# Allegro board circuitorx.brd
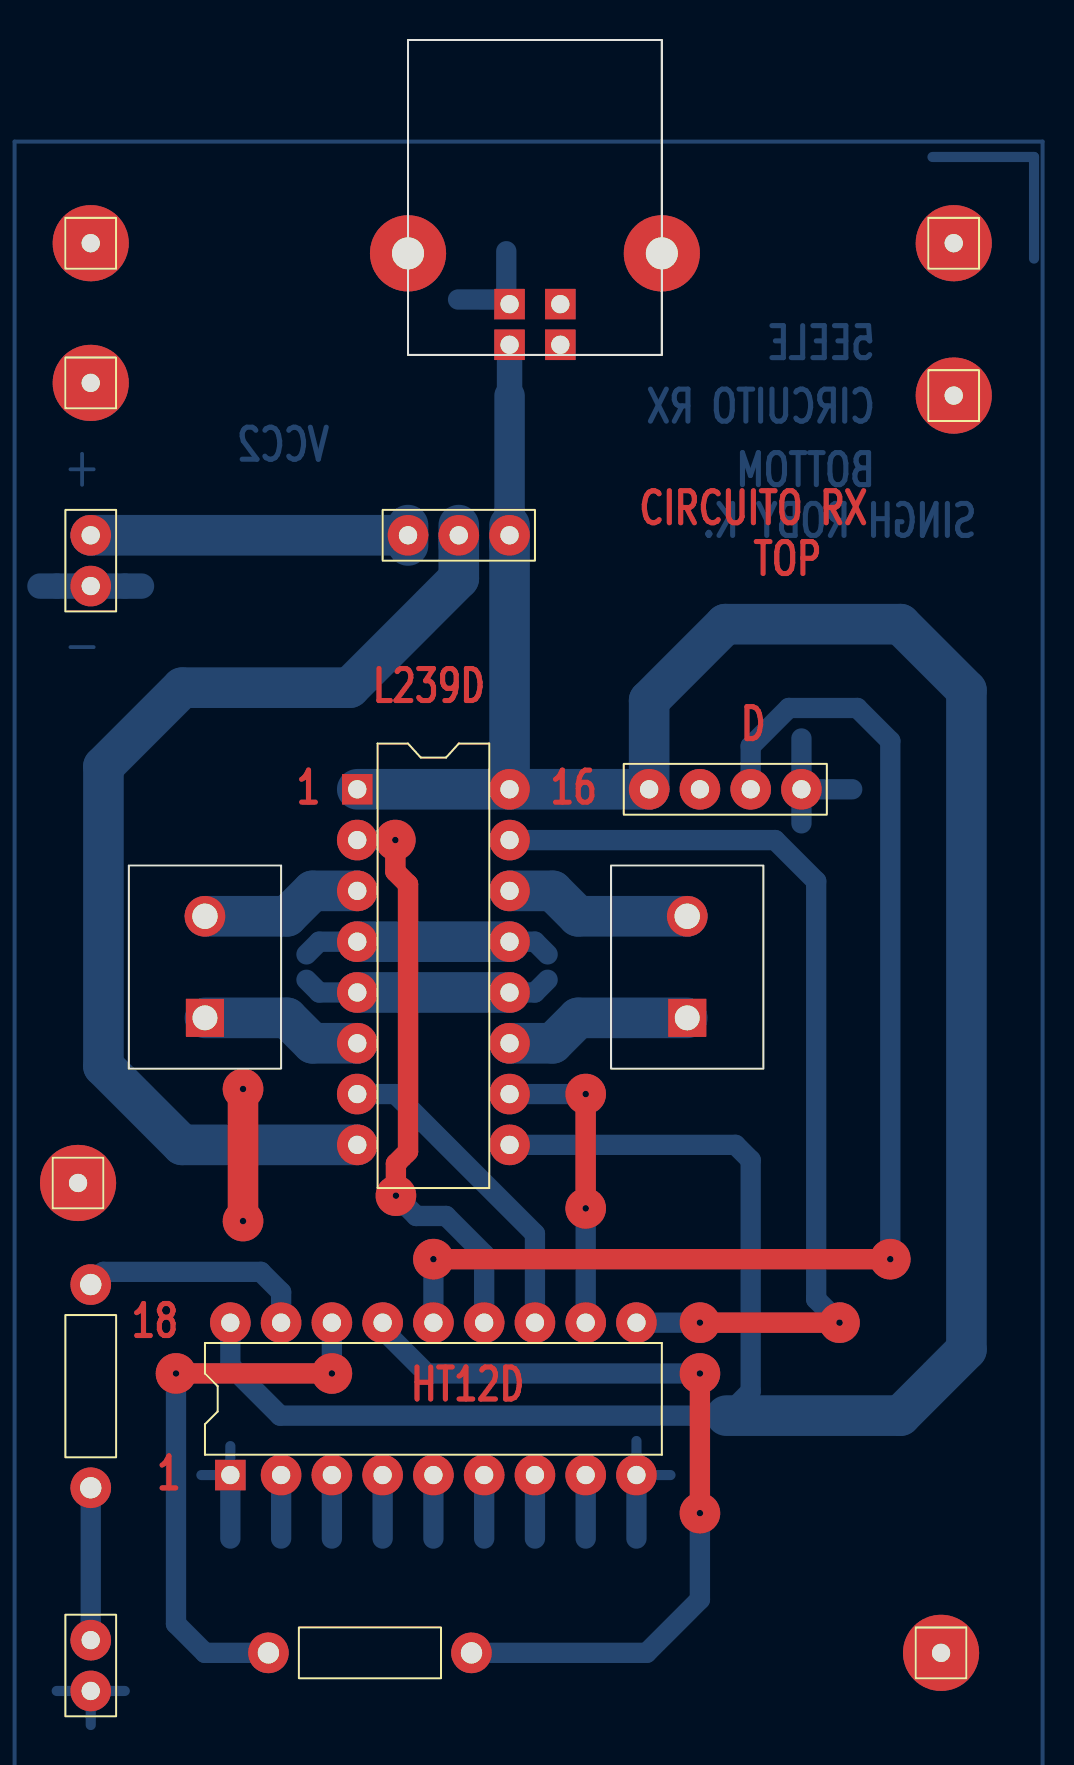
[diagram p0: board, top side]
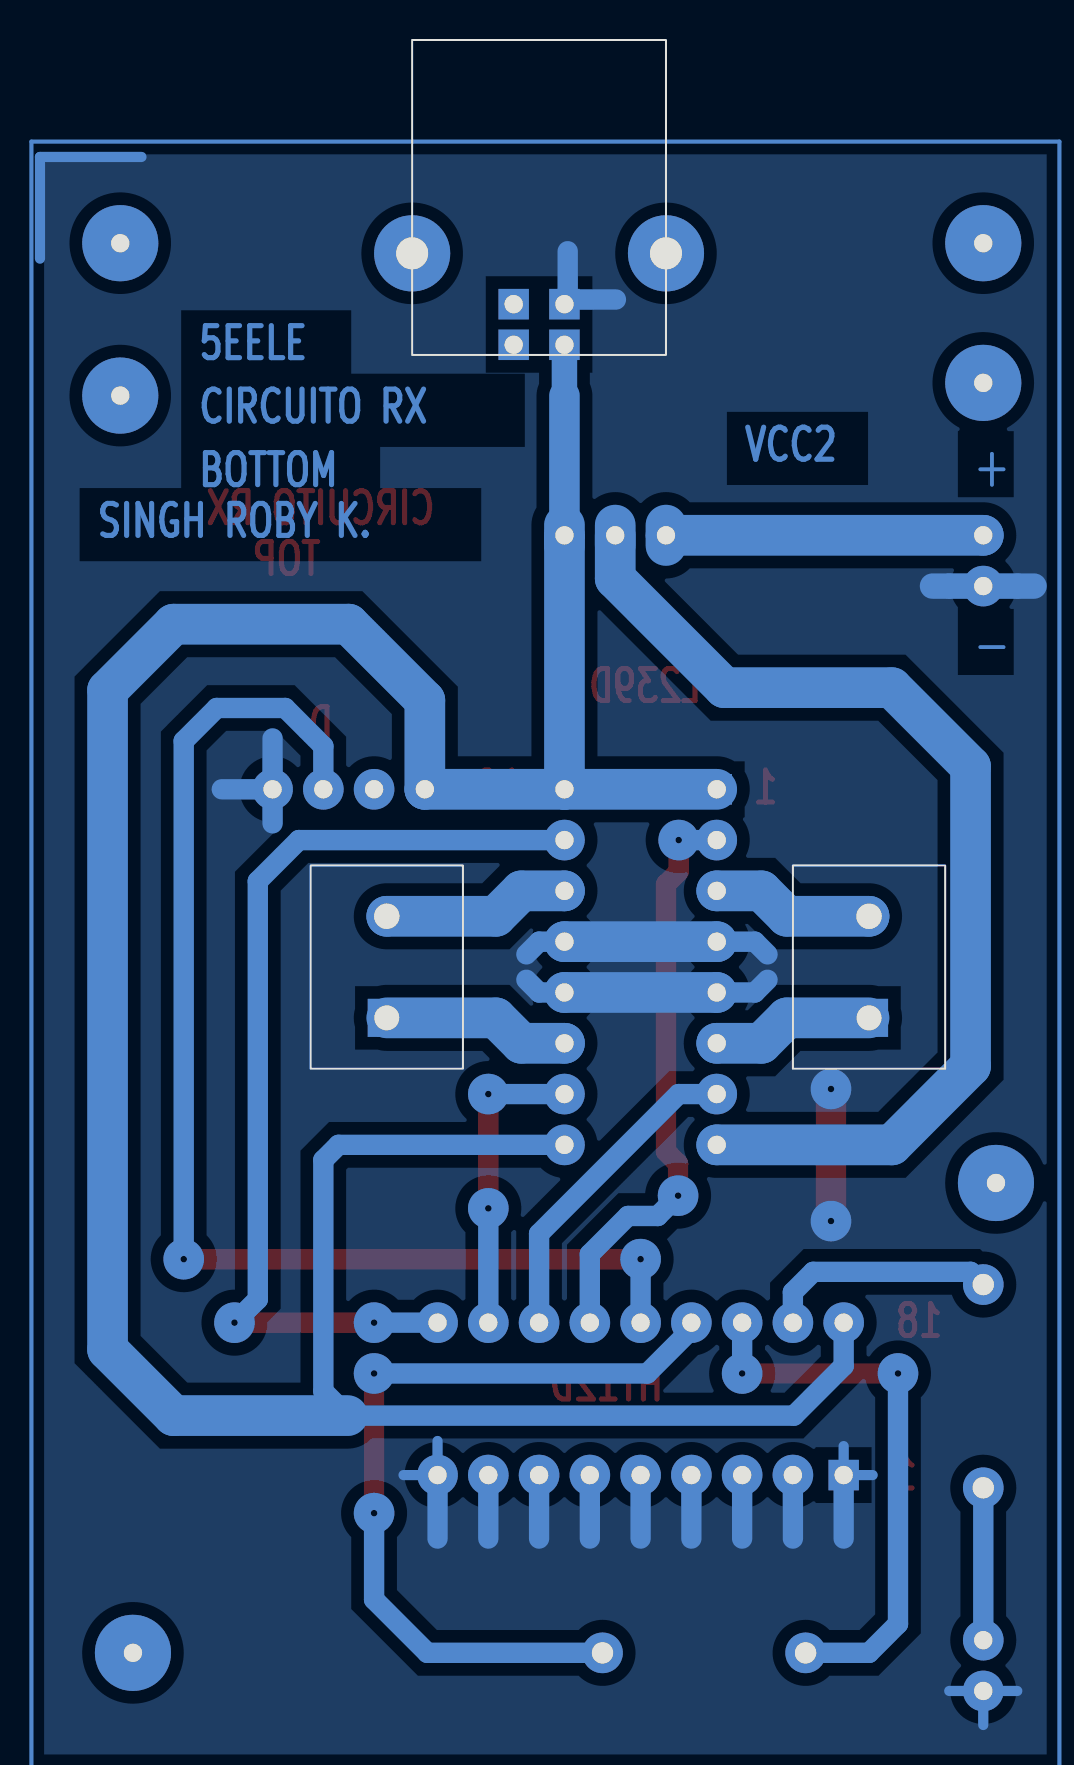
[diagram p1: board, bottom side, seen from below]

Outline 31.75 x 51.44 mm; copper layers: TOP, BOTTOM. Coordinates in mm from the lower left corner of the outline.

## Placement (name value [footprint] x y rotation side)
D1  LED  [JUMPER2]  -1.91 -31.11 90 top
J2  CON1  [JUMPER1]  41.27 41.28 0 top
J3  CON1  [JUMPER1]  40.64 -29.21 0 top
J6  HT12D  [DIP18_3]  5.08 -20.32 90 top
J7  RX  [JUMPER4]  33.66 13.97 180 top
J8  L239D  [DIP16_3]  11.43 13.97 0 top
J9  CON1  [JUMPER1]  41.27 33.66 0 top
J10  CON1  [JUMPER1]  -2.54 -5.71 0 top
J12  USB-B  [USB_B]  19.05 36.2 90 top
J13  CON1  [JUMPER1]  -1.91 41.28 0 top
J14  CON1  [JUMPER1]  -1.91 34.29 0 top
J15  Jumper  [JUMPER3]  13.97 26.67 0 top
J16  Battery2  [JUMPER2]  -1.91 26.67 270 top
MG3  MOTOR DC  [KRESS2]  11.43 -5.08 90 top
MG4  MOTOR DC  [KRESS2]  35.56 -5.08 90 top
R1  330  [RES400]  -1.91 -10.8 180 top
R2  33k  [RES400]  6.98 -29.21 270 top

## Library data of the parts
D1 = LED: User Part Number: ***
J2 J3 J9 J10 J13 J14 = CON1: User Part Number: ***
J6 = CON18A_0: Tolerance: ***; User Part Number: ***
J7 = CON4_1: User Part Number: ***
J8 = CON16B_1: Tolerance: ***; User Part Number: ***
J12 = CON4
J15 = CON3: User Part Number: ***
J16 = CON2: User Part Number: ***
MG3 MG4 = MOTOR AC
R1 R2 = R: Tolerance: ***; User Part Number: ***

## Footprints (pads in the part's own frame, mm; a bottom-side part is the same pattern mirrored in y, then rotated)
DIP16_3
  rect 1.524x1.524 hole 0.914: 1(0,0)
  round 2.032 hole 0.914: 2(0,-2.54) 3(0,-5.08) 4(0,-7.62) 5(0,-10.16) 6(0,-12.7) 7(0,-15.24) 8(0,-17.78) 9(7.62,-17.78) 10(7.62,-15.24) 11(7.62,-12.7) 12(7.62,-10.16) 13(7.62,-7.62) 14(7.62,-5.08) 15(7.62,-2.54) 16(7.62,0)
DIP18_3
  rect 1.524x1.524 hole 0.914: 1(0,0)
  round 2.032 hole 0.914: 2(0,-2.54) 3(0,-5.08) 4(0,-7.62) 5(0,-10.16) 6(0,-12.7) 7(0,-15.24) 8(0,-17.78) 9(0,-20.32) 10(7.62,-20.32) 11(7.62,-17.78) 12(7.62,-15.24) 13(7.62,-12.7) 14(7.62,-10.16) 15(7.62,-7.62) 16(7.62,-5.08) 17(7.62,-2.54) 18(7.62,0)
JUMPER1
  round 3.81 hole 0.914: 1(0,0)
JUMPER2
  round 2.032 hole 0.914: 1(0,0) 2(2.54,0)
JUMPER3
  round 2.032 hole 0.914: 1(0,0)
  oval 2.032x2.032 hole 0.914: 2(2.54,0) 3(5.08,0)
JUMPER4
  round 2.032 hole 0.914: 1(0,0) 2(2.54,0) 3(5.08,0) 4(7.62,0)
KRESS2
  rect 1.905x1.905 hole 1.245: 1(7.62,7.62)
  round 2.032 hole 1.27: 2(12.7,7.62)
RES400
  round 2.032 hole 1.067: 1(0,0) 2(0,10.16)
USB_B
  round 3.81 hole 1.6: (4.572,5.08) (4.572,-7.62)
  rect 1.524x1.524 hole 0.914: 1(0,0) 2(0,-2.54) 3(2.032,-2.54) 4(2.032,0)

## Nets
GND: D1.1(CATHODE) J6.1(A0) J6.2(A1) J6.3(A2) J6.4(A3) J6.5(A4) J6.6(A5) J6.7(A6) J6.8(A7) J6.9(GND) J7.1(GND) J8.4(GND#4) J8.5(GND#5) J8.12(GND#12) J8.13(GND#13) J12.4 J16.2
VCC: J6.18(VCC) J7.4(VCC) J8.1(EN 1/2) J8.9(EN 3/4) J8.16(VCC) J12.1 J15.3
VCC2: J15.1 J16.1
N02013: J6.17(VT) R1.1
N02039: J6.16(OSC1) R2.1
N02229: J6.15(OSC2) R2.2
N02633: D1.2(ANODE) R1.2
N03474: J8.3(OUT1) MG3.2
N03486: J8.6(OUT2) MG3.1
N03609: J8.14(OUT4) MG4.2
N03621: J8.11(OUT3) MG4.1
N03653: J6.10(D8) J8.15(IN4)
N03728: J6.11(D9) J8.10(IN3)
N03753: J6.12(D10) J8.7(IN2)
N03778: J6.13(D11) J8.2(IN1)
N04061: J8.8(VCC2) J15.2
N04117: J6.14(DIN) J7.2(DATA)

Pads without a net: J2 1; J3 1; J7 3; J9 1; J10 1; J12 2 3; J13 1; J14 1

## Via types
v1: diameter 2.032, hole 0.33, TOP to BOTTOM, 14 vias

## Routing (per net, layer and track width the routed paths; a pad name or vN(x,y) marks a point on that pad's centre or on a via; arc(x,y) is an arc through that point)
GND: length 101.5
  TOP w1.524: v1(5.71,-7.62) v1(5.71,-1.02)
  BOTTOM w0.508: 40.21,45.59 45.29,45.59 45.29,40.51 ; 3.63,-20.32 J6.1 5.08,-18.87 ; 19.05,39.68 J12.4 17.6,38.23 ; -1.91,-32.82 D1.1 ; D1.1 -0.2,-31.11 ; D1.1 -3.61,-31.11 ; 25.4,-18.62 J6.9 27.1,-20.32
  BOTTOM w1.016: 18.89,40.87 18.89,38.46 16.47,38.46 ; 20.32,-23.5 J6.7 ; 17.78,-23.5 17.78,-20.32 ; 20.95,5.71 20.32,6.35 19.05,6.35 ; 33.66,16.51 J7.1 ; J7.1 33.66,12.27 ; J7.1 36.2,13.97 ; 20.95,4.45 20.32,3.81 19.05,3.81 ; 8.89,5.71 9.52,6.35 J8.4 ; 12.7,-23.5 J6.4 ; 5.08,-23.5 J6.1 ; 10.16,-23.5 10.16,-20.32 ; 7.62,-23.5 J6.2 ; J8.5 9.52,3.81 8.89,4.45 ; 15.24,-23.5 J6.5 ; 22.86,-23.5 J6.8 ; 25.4,-23.5 J6.9
  BOTTOM w1.27: 0.63,24.13 J16.2 -4.45,24.13
  BOTTOM w2.032: 19.05,3.81 J8.5 ; J8.4 19.05,6.35
VCC: length 160.1
  BOTTOM w1.016: 19.05,-3.81 30.35,-3.81 31.11,-4.57 31.11,-16.13 29.9,-17.35 7.57,-17.35 5.08,-14.86 J6.18
  BOTTOM w1.27: J12.1 19.05,33.66
  BOTTOM w1.524: 19.05,33.66 J15.3
  BOTTOM w2.032: 29.9,-17.35 38.61,-17.35 41.91,-14.05 41.91,18.92 38.61,22.23 29.84,22.23 26.04,18.41 J7.4 19.05,13.97 ; 19.05,13.97 J15.3 ; 19.05,13.97 J8.1
VCC2: length 15.9
  BOTTOM w2.032: J16.1 J15.1
N02013: length 11.7
  BOTTOM w1.016: J6.17 7.62,-11.18 6.6,-10.16 -1.27,-10.16 R1.1
N02039: length 28.1
  TOP w1.016: v1(2.36,-15.24) v1(10.16,-15.24)
  BOTTOM w1.016: R2.1 3.81,-29.21 2.36,-27.76 v1(2.36,-15.24) ; v1(10.16,-15.24) 10.16,-12.7
N02229: length 41
  TOP w1.016: v1(28.57,-22.23) v1(28.57,-15.24)
  BOTTOM w1.016: v1(28.57,-15.24) 14.91,-15.24 12.7,-13.03 J6.15 ; v1(28.57,-22.23) 28.57,-26.54 25.91,-29.21 R2.2
N02633: length 7.6
  BOTTOM w1.016: D1.2 R1.2
N03474: length 8.1
  BOTTOM w2.032: MG3.2 7.92,7.62 9.19,8.89 J8.3
N03486: length 8.1
  BOTTOM w2.032: 3.81,2.54 7.92,2.54 9.19,1.27 J8.6
N03609: length 9.4
  BOTTOM w2.032: MG4.2 22.48,7.62 21.21,8.89 19.05,8.89
N03621: length 9.4
  BOTTOM w2.032: 19.05,1.27 21.21,1.27 22.48,2.54 27.94,2.54
N03653: length 48.9
  TOP w1.016: v1(35.56,-12.7) v1(28.57,-12.7)
  BOTTOM w1.016: 19.05,11.43 32.34,11.43 34.39,9.37 34.39,-11.53 v1(35.56,-12.7) ; v1(28.57,-12.7) J6.10
N03728: length 15.2
  TOP w1.016: v1(22.86,-6.98) v1(22.86,-1.27)
  BOTTOM w1.016: J6.11 v1(22.86,-6.98) ; v1(22.86,-1.27) 19.05,-1.27
N03753: length 16.2
  BOTTOM w1.016: J6.12 20.32,-8.26 13.33,-1.27 J8.7
N03778: length 29.3
  TOP w1.016: v1(13.33,11.43) 13.33,9.86 13.97,9.22 13.97,-4.14 13.36,-4.75 v1(13.36,-6.35)
  BOTTOM w1.016: v1(13.36,-6.35) 14.38,-7.37 15.87,-7.37 17.78,-9.27 17.78,-12.7 ; J8.2 v1(13.33,11.43)
N04061: length 53.1
  BOTTOM w2.032: J8.8 2.67,-3.81 -1.27,0.13 -1.27,15.11 2.67,19.05 11.05,19.05 16.51,24.51 J15.2
N04117: length 62.6
  TOP w1.016: v1(38.1,-9.53) v1(15.24,-9.53)
  BOTTOM w1.016: v1(38.1,-9.53) 38.1,16.38 36.45,18.03 33.02,18.03 31.11,16.13 J7.2 ; v1(15.24,-9.53) J6.14

## Copper pours and planes (outline as drawn; the poured copper is in the pictures)
GND on BOTTOM: -5.08,46.99 -5.08,-34.29 46.36,-34.29 46.36,46.99

## Text on the board
BOTTOM: VCC2 | 5EELE | CIRCUITO RX | BOTTOM | SINGH ROBY K. | + | -
TOP: 18 | 1 | L239D | HT12D | 16 | CIRCUITO RX | D | TOP
Ref Des/Assembly Top: + | -
